# Altium PCB OFP_MCM_v1.6.3.PcbDoc (part 3 of 8)
Units mil, origin at the board's own origin, x right, y up, seen from the top; angles counter-clockwise.
Board outline 4330.71 x 4724.41 mil, 4 copper layers (Top Layer, Layer 1, Layer 2, Bottom Layer), stack 62.047 mil thick; 385 components, 287 nets, 1341 pads, 554 vias.
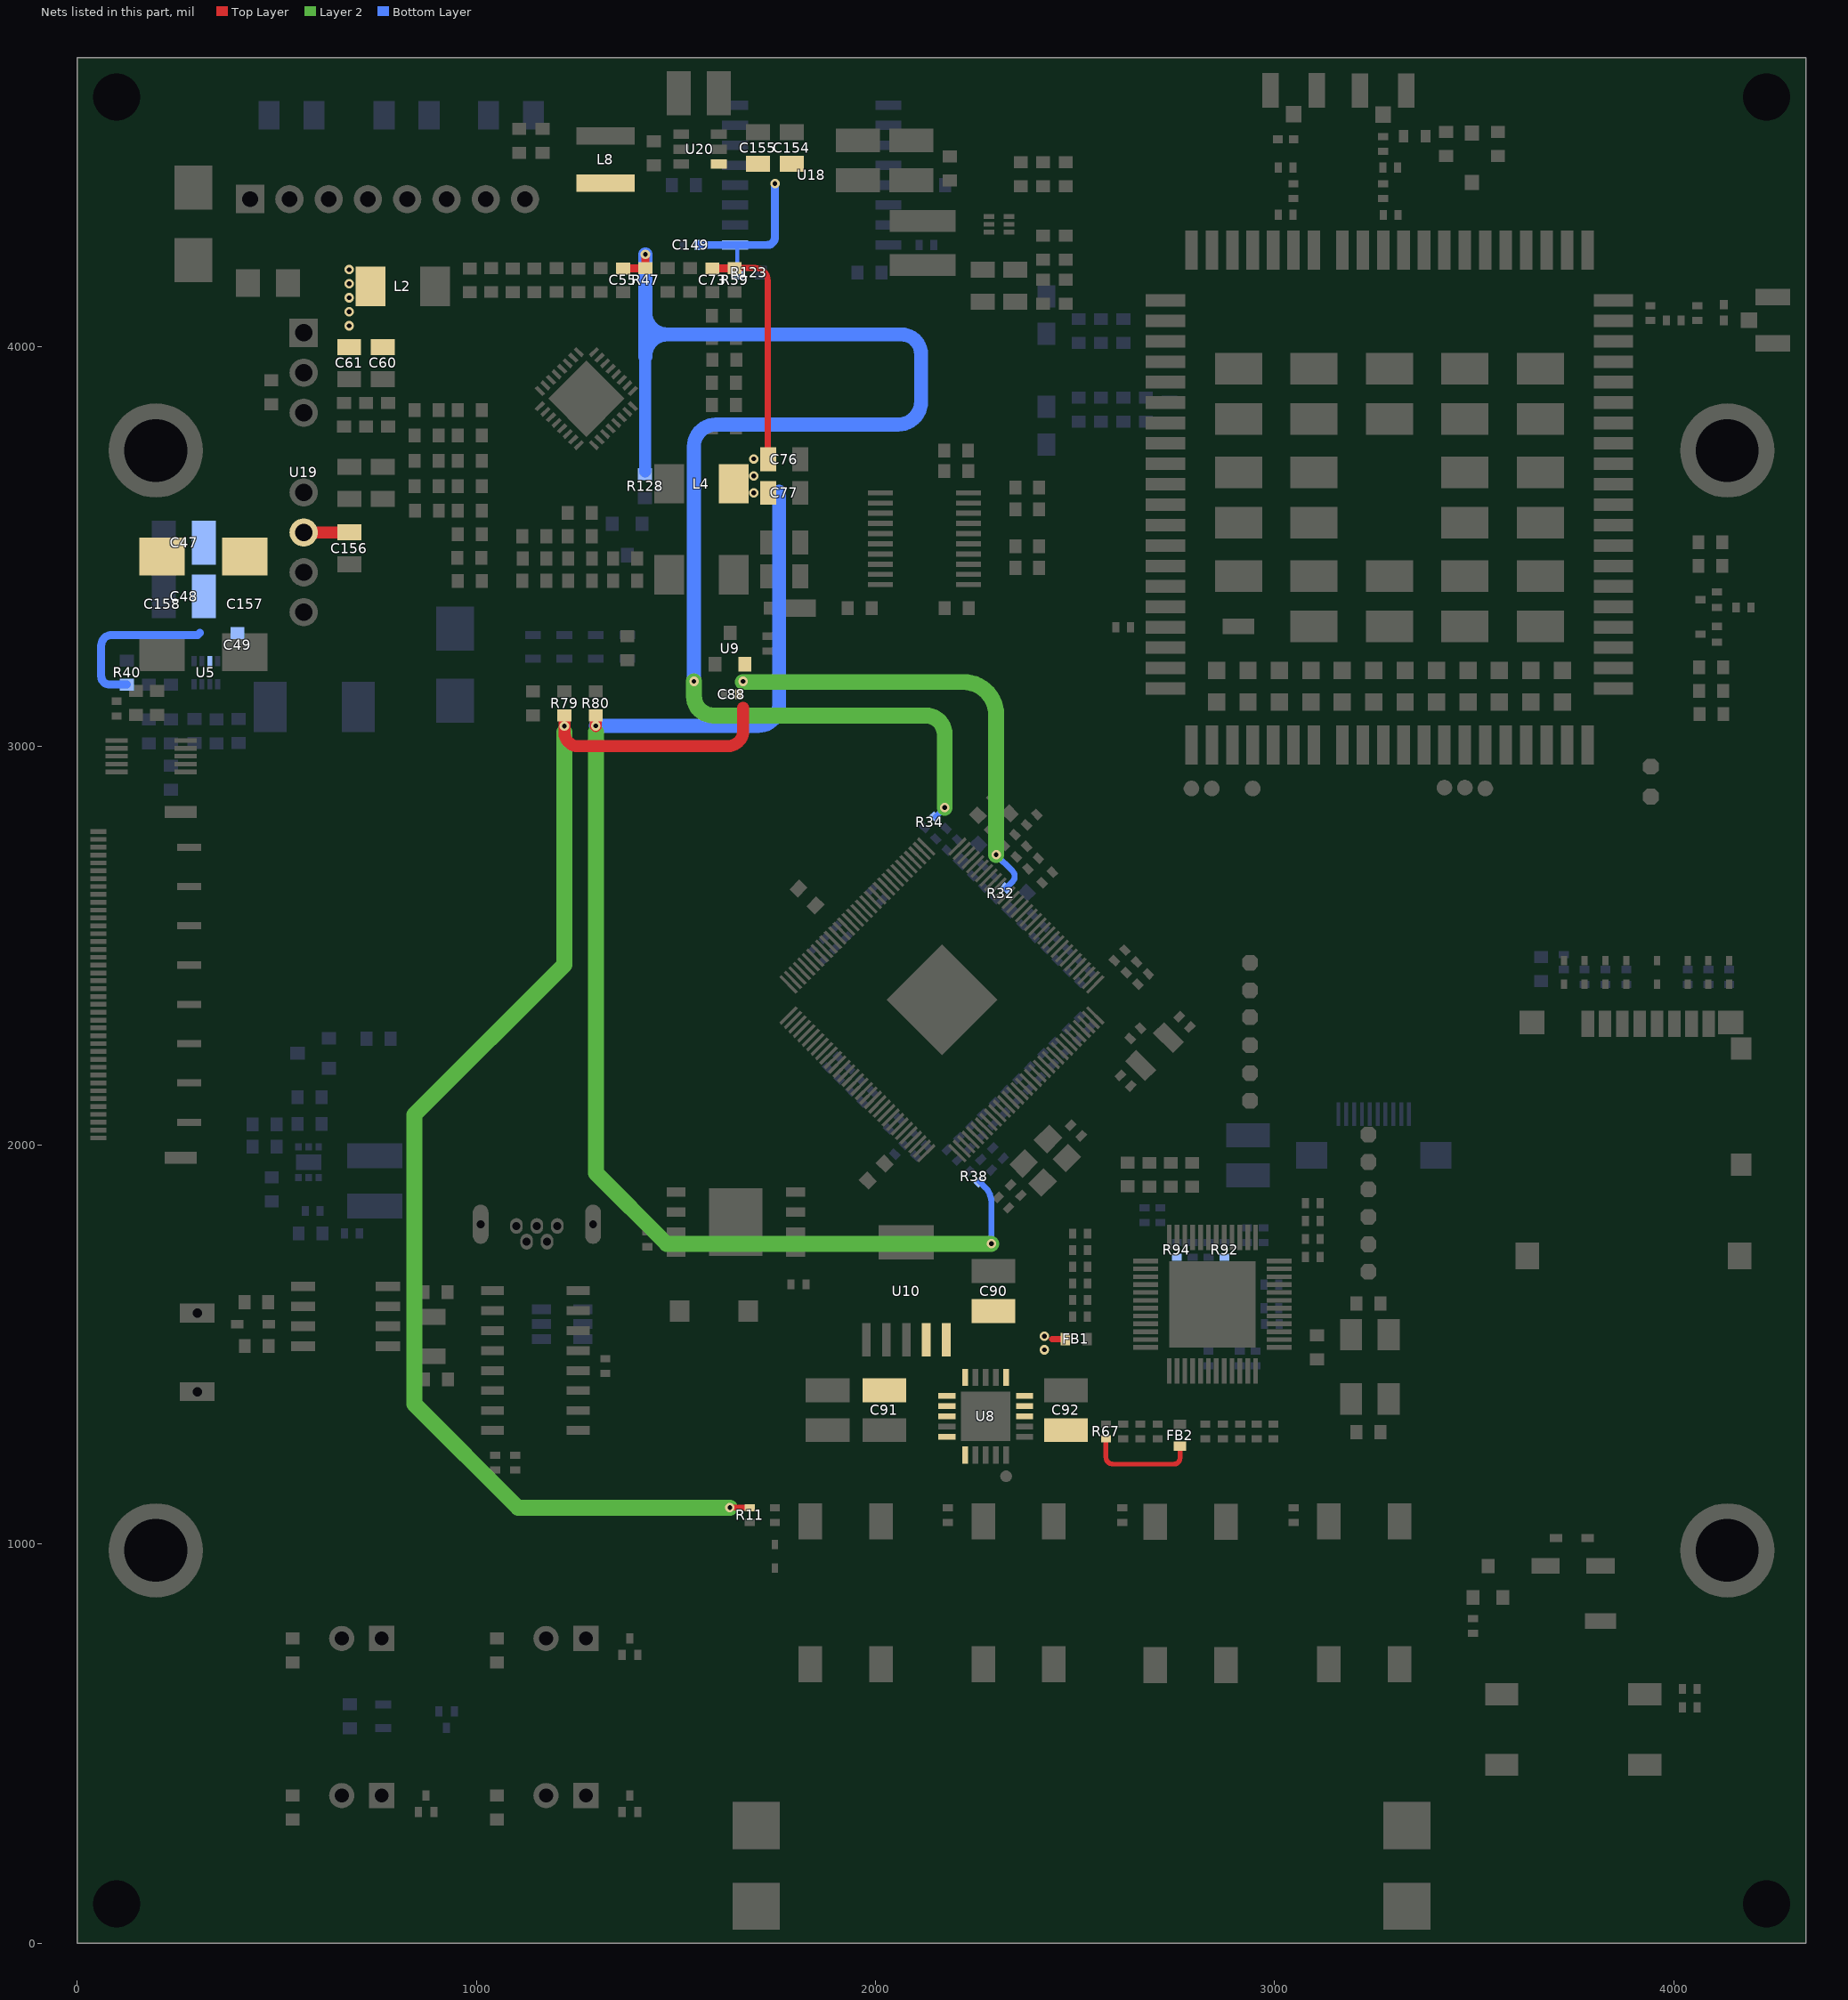
[diagram p4: the nets of this part, all layers, seen from the top]

## Part data (continued)
C152: library part C3216X5R1E476M160AC, "CAP CER 47UF 25V X5R 1206", Case Code (Imperial)=1206, Case Code (Metric)=3216, Dielectric=X5R, Dielectric Material=Ceramic, LCSC Part Number=C2167787, Manufacturer=TDK, Max Operating Temperature=85°C, Min Operating Temperature=-55°C, Package Quantity=1, Supplier Part Number 1=445-8047-1-ND, Tolerance=20%, Voltage=25V, Capacitance=47uF, Case/Package=1206, ComponentLink1Description=https://product.tdk.com/info/en/catalog/datasheets/mlcc_commercial_general_en.pdf?src-supplier=Digi-Key, ComponentLink1URL=https://product.tdk.com/info/en/catalog/datasheets/mlcc_commercial_general_en.pdf?src-supplier=Digi-Key, ComponentLink2Description=https://product.tdk.com/info/en/documents/chara_sheet/C3216X5R1E476M160AC.pdf?src-supplier=Digi-Key, ComponentLink2URL=https://product.tdk.com/info/en/documents/chara_sheet/C3216X5R1E476M160AC.pdf?src-supplier=Digi-Key, ComponentLink3Description=http://www.tdk.com/pdf/general_B11.pdf?src-supplier=Future+Electronics, ComponentLink3URL=http://www.tdk.com/pdf/general_B11.pdf?src-supplier=Future+Electronics, Depth=1.6mm, Height=1.6mm, Lead Free="Lead Free", Length=0.126inch, Manufacturer Part Number=C3216X5R1E476M160AC, Mount="Surface Mount", Packaging="Tape and Reel", Pricing 1="1=1.09, 10=0.862, 50=0.7476, 100=0.6469, 500=0.48876, 1000=0.43125 (USD)", REACH SVHC="No SVHC", Resistor Type=Ceramic, Series=C, Stock 1=886163, Supplier 1=Digi-Key, Termination=SMD/SMT, Thickness=0.071inch, Voltage Rating=25V, Voltage Rating (DC)=25V, Weight=0.000571oz, Width=0.063inch
C156: library part CC0805MKX5R8BB226, "CAP CER 22UF 25V X5R 0805", Case Code (Imperial)=0805, Case Code (Metric)=2012, Dielectric=X5R, LCSC Part Number=C784585, Manufacturer=Yageo, Max Operating Temperature=85°C, Min Operating Temperature=-55°C, Package Quantity=3000, Supplier Part Number 1=311-1903-1-ND, Tolerance=20%, Voltage Rating=25V, Capacitance=22uF, Case/Package=0805, Category="Ceramic Capacitors", ComponentLink1Description=http://www.mouser.com/ds/2/447/Yageo_UPY-GP_NP0_16V-to-50V_9-358835.pdf?src-supplier=Mouser, ComponentLink1URL=http://www.mouser.com/ds/2/447/Yageo_UPY-GP_NP0_16V-to-50V_9-358835.pdf?src-supplier=Mouser, ComponentLink2Description=http://www.yageo.com/documents/recent/UPY-GPHC_X5R_4V-to-50V_25.pdf?src-supplier=Digi-Key, ComponentLink2URL=http://www.yageo.com/documents/recent/UPY-GPHC_X5R_4V-to-50V_25.pdf?src-supplier=Digi-Key, Halogen Free="Halogen Free", Height=1.25mm, Item Type=Capacitor, Lead Free="Lead Free", Length=0.079inch, Manufacturer Part Number=CC0805MKX5R8BB226, Mount="Surface Mount", Packaging="Tape and Reel", Pricing 1="1=0.47000, 10=0.33300, 50=0.25140, 100=0.21900, 500=0.16222, 1000=0.13789 (USD)", RoHS=Yes, RoHS Compliant=Yes, Stock 1=64970, Supplier 1=Digi-Key, Termination=SMD/SMT, Thickness=0.057inch, Voltage Rating (DC)=25V, Weight=0.000194oz, Width=0.049inch
C157 C158: library part TPSD476K025R0150, "47uF 25V 150mΩ@100kHz ±10% CASE-D-7343-31(mm) Tantalum Capacitors ROHS", LCSC Part Number=C284846, Manufacturer="Kyocera AVX", Package=CASE-D-7343-31(mm), Item Type=Capacitor, Manufacturer Part Number=TPSD476K025R0150
D1 D2 D3 D4 D5 D6 D7 D8 D10: "5A 60W 12V 3.6V 3.3V SOD-523 ESD and Surge Protection (TVS/ESD) ROHS", LCSC Part Number=C502551, Manufacturer="MDD(Microdiode Semiconductor)", Package=SOD-523, ComponentLink1Description=LCSC, ComponentLink1URL=https://www.lcsc.com/product-detail/ESD-and-Surge-Protection-TVS-ESD_MDD-Microdiode-Semiconductor-ESD5Z3-3C_C502551.html, Item Type=(TVS/ESD), Manufacturer Part Number=ESD5Z3.3C
D9 D20: "DIODE GEN PURP 75V 200MA SOD523F", Average Rectified Current=200mA, Forward Current=300mA, LCSC Part Number=C232841, Manufacturer="ON Semiconductor / Fairchild", Max Forward Surge Current (Ifsm)=4A, Max Operating Temperature=150°C, Max Repetitive Reverse Voltage (Vrrm)=75V, Max Reverse Current=5uA, Min Operating Temperature=-55°C, Package Quantity=1, Power Dissipation=200mW, Supplier Part Number 1=6145918, Category="Rectifier Diodes", ComponentLink1Description=https://datasheet.ciiva.com/16744/1n4148wt-16744972.pdf?src-supplier=Future+Electronics, ComponentLink1URL=https://datasheet.ciiva.com/16744/1n4148wt-16744972.pdf?src-supplier=Future+Electronics, ComponentLink2Description=https://datasheet.ciiva.com/30479/0900766b810e1cd4-30479226.pdf?src-supplier=Rs, ComponentLink2URL=https://datasheet.ciiva.com/30479/0900766b810e1cd4-30479226.pdf?src-supplier=Rs, ComponentLink3Description=https://datasheet.ciiva.com/15208/getdatasheetpartid-146392-15208359.pdf?src-supplier=Verical, ComponentLink3URL=https://datasheet.ciiva.com/15208/getdatasheetpartid-146392-15208359.pdf?src-supplier=Verical, ComponentLink4Description=https://datasheet.ciiva.com/916/1n914bwt-916865.pdf?src-supplier=Digi-Key, ComponentLink4URL=https://datasheet.ciiva.com/916/1n914bwt-916865.pdf?src-supplier=Digi-Key, ComponentLink5Description=https://datasheet.ciiva.com/916/1n914bwt-916866.pdf?src-supplier=Digi-Key, ComponentLink5URL=https://datasheet.ciiva.com/916/1n914bwt-916866.pdf?src-supplier=Digi-Key, ComponentLink6Description=https://datasheet.ciiva.com/916/1n914bwt-916864.pdf?src-supplier=Digi-Key, ComponentLink6URL=https://datasheet.ciiva.com/916/1n914bwt-916864.pdf?src-supplier=Digi-Key, Contact Plating=Tin,Matte, Element Configuration=Single, Height=0.7mm, Item Type=Diode, Lead Free="Lead Free", Length=1.3mm, Manufacturer Part Number=1N4148WT, Max Reverse Voltage (DC)=75V, Mounting Technology="Surface Mount", Packaging="Tape and Reel", Pins=2, Pricing 1="1=0.0305, 20=0.0267, 125=0.0246, 750=0.0227, 4000=0.0204 (USD)", Radiation Hardening=No, Reach SVHC Compliant=No, Recovery Time=4ns, Reverse Recovery Time=4ns, Reverse Recovery Time-Max=4ns, RoHS=Yes, RoHS Compliant=Yes, Series=-, Stock 1=30, Supplier 1="Future Electronics", Weight=0.01g, Width=0.9mm
D11: library part 1N5819HW-7-F, "DIODE SCHOTTKY 40V 1A SOD123", Average Rectified Current=1A, Capacitance=110pF, Case/Package=SOD-123-2, Forward Voltage=450mV, LCSC Part Number=C82544, Manufacturer=Diodes, Max Forward Surge Current (Ifsm)=25A, Max Operating Temperature=125°C, Max Power Dissipation=450mW, Max Repetitive Reverse Voltage (Vrrm)=40V, Max Reverse Current=50uA, Min Operating Temperature=-65°C, Package Quantity=3000, Supplier Part Number 1=1N5819HW-FDICT-ND, Category="Schottky Diodes", ComponentLink1Description=https://datasheet.ciiva.com/16303/ds30217-16303296.pdf?src-supplier=Future+Electronics, ComponentLink1URL=https://datasheet.ciiva.com/16303/ds30217-16303296.pdf?src-supplier=Future+Electronics, ComponentLink2Description=https://datasheet.ciiva.com/27092/1538419-27092484.pdf?src-supplier=Jameco, ComponentLink2URL=https://datasheet.ciiva.com/27092/1538419-27092484.pdf?src-supplier=Jameco, ComponentLink3Description=https://datasheet.ciiva.com/912/ds30217-912801.pdf?src-supplier=Digi-Key, ComponentLink3URL=https://datasheet.ciiva.com/912/ds30217-912801.pdf?src-supplier=Digi-Key, ComponentLink4Description=https://datasheet.ciiva.com/1177/ds30217-1177089.pdf?src-supplier=Element14, ComponentLink4URL=https://datasheet.ciiva.com/1177/ds30217-1177089.pdf?src-supplier=Element14, ComponentLink5Description=https://datasheet.ciiva.com/912/ds30217-912802.pdf?src-supplier=Digi-Key, ComponentLink5URL=https://datasheet.ciiva.com/912/ds30217-912802.pdf?src-supplier=Digi-Key, ComponentLink6Description=https://datasheet.ciiva.com/912/ds30217-912803.pdf?src-supplier=Digi-Key, ComponentLink6URL=https://datasheet.ciiva.com/912/ds30217-912803.pdf?src-supplier=Digi-Key, ComponentLink7Description=https://datasheet.ciiva.com/8303/ds30217-8303132.pdf?src-supplier=Avnet, ComponentLink7URL=https://datasheet.ciiva.com/8303/ds30217-8303132.pdf?src-supplier=Avnet, ComponentLink8Description=https://datasheet.ciiva.com/25919/ds30217-25919644.pdf?src-supplier=Avnet+Europe, ComponentLink8URL=https://datasheet.ciiva.com/25919/ds30217-25919644.pdf?src-supplier=Avnet+Europe, Contact Plating=Tin,Matte, Current Rating=1A, Element Configuration=Single, Forward Current=1A, Height=1.25mm, Item Type=Diode, Lead Free="Lead Free", Length=2.85mm, Manufacturer Part Number=1N5819HW-7-F, Max Reverse Voltage (DC)=40V, Number of Pins=2, Output Current=1A, Packaging="Tape and Reel", Peak Non-Repetitive Surge Current=25A, Polarity=Standard, Pricing 1="1=0.46000, 10=0.34500, 100=0.19530, 500=0.12936, 1000=0.09918 (USD)", Radiation Hardening=No, REACH SVHC="No SVHC", RoHS=Yes, RoHS Compliant=Yes, Series=-, Supplier 1=Digi-Key, Termination=SMD/SMT, Voltage Rating (DC)=40V, Weight=0.000353oz, Width=1.7mm
D12: "65.2A 9.2V 6.4V 5V Unidirectional SMB TVS ROHS", LCSC Part Number=C440263, Manufacturer=AnBon, Package=SMB, ComponentLink7Description=LCSC, ComponentLink7URL=https://www.lcsc.com/product-detail/TVS_AnBon-SMBJ5-0A_C440263.html, Item Type=Diode, Manufacturer Part Number=SMBJ5.0A
D13: "TVS DIODE 3.3VWM 11.5VC MICROSMP", Breakdown Voltage=4.1V, Clamping Voltage=11V, LCSC Part Number=C241899, Manufacturer="Vishay Semiconductors", Max Operating Temperature=150°C, Max Reverse Leakage Current=200uA, Max Surge Current=75A, Min Operating Temperature=-55°C, Operating Supply Voltage=3.3V, Package Quantity=4500, Peak Pulse Current=87A, Peak Pulse Power=150W, Power Line Protection=No, Supplier Part Number=625-MSP3V3HM3, Test Current=1mA, Category="TVS Diodes", ComponentLink1Description=https://datasheet.ciiva.com/14080/msp3v3-14080471.pdf?src-supplier=Digikey, ComponentLink1URL=https://datasheet.ciiva.com/14080/msp3v3-14080471.pdf?src-supplier=Digikey, ComponentLink2Description=https://datasheet.ciiva.com/14080/msp3v3-14080471.pdf?src-supplier=Digi-Key, ComponentLink2URL=https://datasheet.ciiva.com/14080/msp3v3-14080471.pdf?src-supplier=Digi-Key, Diode Type=ZENER, Direction=Unidirectional, Item Type="TVS Diode", Manufacturer Part Number=MSP3V3HM3/89A, Min Breakdown Voltage=4.1V, Mounting Technology="Surface Mount", Number of Unidirectional Channels=1, Packaging="Tape and Reel", Polarity=Unidirectional, Pricing="1=0.39, 10=0.313, 50=0.313, 100=0.165, 1000=0.068, 10000=0.05 (USD)", Reverse Standoff Voltage=3.3V, RoHS=Yes, RoHS Compliant=Yes, Series="Automotive, AEC-Q101, TransZorb®, eSMP™", Stock=14861, Supplier=Mouser
D14: "TVS DIODE 12VWM 19.9VC DO214AA", LCSC Part Number=C151251, Manufacturer=Littelfuse, ComponentLink1Description=https://datasheet.ciiva.com/15143/getdatasheetpartid-185160-15143884.pdf?src-supplier=Verical, ComponentLink1URL=https://datasheet.ciiva.com/15143/getdatasheetpartid-185160-15143884.pdf?src-supplier=Verical, ComponentLink2Description=https://datasheet.ciiva.com/34302/1546611-34302457.pdf?src-supplier=Jameco, ComponentLink2URL=https://datasheet.ciiva.com/34302/1546611-34302457.pdf?src-supplier=Jameco, ComponentLink3Description=https://datasheet.ciiva.com/25624/0900766b810f4eeb-25624681.pdf?src-supplier=Rs, ComponentLink3URL=https://datasheet.ciiva.com/25624/0900766b810f4eeb-25624681.pdf?src-supplier=Rs, ComponentLink4Description=https://datasheet.ciiva.com/16287/littelfuse-tvs-diode-smbj-16287565.pdf?src-supplier=Future+Electronics, ComponentLink4URL=https://datasheet.ciiva.com/16287/littelfuse-tvs-diode-smbj-16287565.pdf?src-supplier=Future+Electronics, ComponentLink5Description=https://datasheet.ciiva.com/331/littelfuse-tvs-diode-smbj-datasheet-pdf-331137.pdf?src-supplier=Digikey, ComponentLink5URL=https://datasheet.ciiva.com/331/littelfuse-tvs-diode-smbj-datasheet-pdf-331137.pdf?src-supplier=Digikey, ComponentLink6Description=https://datasheet.ciiva.com/331/littelfuse-tvs-diode-smbj-datasheet-pdf-331138.pdf?src-supplier=Digikey, ComponentLink6URL=https://datasheet.ciiva.com/331/littelfuse-tvs-diode-smbj-datasheet-pdf-331138.pdf?src-supplier=Digikey, ComponentLink7Description=https://datasheet.ciiva.com/331/littelfuse-tvs-diode-smbj-datasheet-pdf-331139.pdf?src-supplier=Digikey, ComponentLink7URL=https://datasheet.ciiva.com/331/littelfuse-tvs-diode-smbj-datasheet-pdf-331139.pdf?src-supplier=Digikey, ComponentLink8Description=https://datasheet.ciiva.com/8062/littelfuse-tvs-diode-smbj-8062301.pdf?src-supplier=Element14, ComponentLink8URL=https://datasheet.ciiva.com/8062/littelfuse-tvs-diode-smbj-8062301.pdf?src-supplier=Element14, Item Type="TVS Diodes", Manufacturer Part Number=SMBJ12A, Pricing="1=0.32, 10=0.215, 100=0.104 (USD)", RoHS=Yes, Stock=39718, Supplier=Digikey
D15 D16: "TVS DIODE 3.6VWM 19VC 2X1SON", Breakdown Voltage=6.7V, Case Code (Imperial)=0402, Case Code (Metric)=1006, Manufacturer="Texas Instruments", Max Operating Temperature=125°C, Min Operating Temperature=-40°C, Peak Pulse Current=1.7A, Peak Pulse Power=15W, Power Line Protection=No, Reverse Standoff Voltage=3.6V, Supplier Part Number=296-47864-1-ND, Case/Package=0402, Category="Integrated Circuits (ICs)", ComponentLink1Description=http://www.ti.com/lit/ds/symlink/tpd1e0b04.pdf?src-supplier=Digikey, ComponentLink1URL=http://www.ti.com/lit/ds/symlink/tpd1e0b04.pdf?src-supplier=Digikey, ComponentLink2Description=http://www.ti.com/general/docs/suppproductinfo.tsp?distId=10&amp;gotoUrl=http%3A%2F%2Fwww.ti.com%2Flit%2Fgpn%2Ftpd1e0b04&src-supplier=Digikey, ComponentLink2URL=http://www.ti.com/general/docs/suppproductinfo.tsp?distId=10&amp;gotoUrl=http%3A%2F%2Fwww.ti.com%2Flit%2Fgpn%2Ftpd1e0b04&src-supplier=Digikey, Diode Type=ZENER, Direction=211Direction, Height=450um, Interface=USB, Length=600um, Manufacturer Part Number=TPD1E0B04DPYR, Min Breakdown Voltage=6.7V, Mounting Technology="Surface Mount", Number of Bidirectional Channels=1, Number of Channels=1, Packaging="Cut Tape", Pins=2NUMBER, Pricing="1=0.32, 10=0.216, 100=0.095, 500=0.09, 1000=0.08874 (USD)", RoHS=Yes, RoHS Compliant=Yes, Series=-, Stock=16132, Supplier=Digikey, Thickness=370um, Width=1mm
D17 D18 D19: "TVS DIODE 3.3VWM 6.8VC SOD123F", Breakdown Voltage=3.4V, LCSC Part Number=C2649858, Manufacturer=Littelfuse, Max Breakdown Voltage=4.3V, Max Operating Temperature=150°C, Max Reverse Leakage Current=500nA, Min Operating Temperature=-55°C, Peak Pulse Current=30A, Peak Pulse Power=200W, Power Line Protection=No, Reverse Standoff Voltage=3.3V, Test Current=10mA, Diode Type=ZENER, Direction=210Direction, Height=1.08mm, Item Type="TVS Diodes", Manufacturer Part Number=SMF3.3, Min Breakdown Voltage=3.4V, Mounting Technology="Surface Mount", Number of Channels=1NUMBER, Number of Unidirectional Channels=1, Packaging="Cut Tape", Pricing="1=0.49, 10=0.313, 100=0.171, 500=0.153, 1000=0.151 (USD)", Reverse Voltage=3.3V, RoHS=Yes, RoHS Compliant=Yes, Series=SMF, Stock=66904, Supplier=Digikey
FB1 FB2: "FERRITE BEAD 220 OHM 0603 1LN", Case Code (Imperial)=0603, Case Code (Metric)=1608, Current Rating=1.4A, DC Resistance (DCR)=100mR, ESR (Equivalent Series Resistance)=220R, LCSC Part Number=C80165, Manufacturer=Murata, Manufacturer Series=BLM18P, Max Operating Temperature=125°C, Min Operating Temperature=-55°C, Package Quantity=1, Test Frequency=100MHz, Tolerance=25%, Case/Package=0603, Channels=1, ComponentLink1Description=https://datasheet.ciiva.com/19458/1845030-19458417.pdf?src-supplier=Jameco, ComponentLink1URL=https://datasheet.ciiva.com/19458/1845030-19458417.pdf?src-supplier=Jameco, ComponentLink2Description=https://datasheet.ciiva.com/11800/0900766b81275ca5-11800851.pdf?src-supplier=Rs, ComponentLink2URL=https://datasheet.ciiva.com/11800/0900766b81275ca5-11800851.pdf?src-supplier=Rs, ComponentLink3Description=https://datasheet.ciiva.com/29347/442391-da-01-en-chip-drossel-0603-220r-1400ma-1-6x0-8mm-29347986.pdf?src-supplier=Conrad, ComponentLink3URL=https://datasheet.ciiva.com/29347/442391-da-01-en-chip-drossel-0603-220r-1400ma-1-6x0-8mm-29347986.pdf?src-supplier=Conrad, ComponentLink4Description=https://datasheet.ciiva.com/8021/5148-8021482.pdf?src-supplier=Element14, ComponentLink4URL=https://datasheet.ciiva.com/8021/5148-8021482.pdf?src-supplier=Element14, ComponentLink5Description=https://datasheet.ciiva.com/8021/5148-8021479.pdf?src-supplier=Element14, ComponentLink5URL=https://datasheet.ciiva.com/8021/5148-8021479.pdf?src-supplier=Element14, ComponentLink6Description=https://datasheet.ciiva.com/14122/blm-series-eng-tds-14122909.pdf?src-supplier=Distrelec, ComponentLink6URL=https://datasheet.ciiva.com/14122/blm-series-eng-tds-14122909.pdf?src-supplier=Distrelec, ComponentLink7Description=https://datasheet.ciiva.com/1012/l0110s0100blm18p-1012162.pdf?src-supplier=Digikey, ComponentLink7URL=https://datasheet.ciiva.com/1012/l0110s0100blm18p-1012162.pdf?src-supplier=Digikey, ComponentLink8Description=https://datasheet.ciiva.com/1012/l0110s0100blm18p-1012161.pdf?src-supplier=Digikey, ComponentLink8URL=https://datasheet.ciiva.com/1012/l0110s0100blm18p-1012161.pdf?src-supplier=Digikey, ComponentLink9Description=https://datasheet.ciiva.com/1012/l0110s0100blm18p-1012163.pdf?src-supplier=Digikey, ComponentLink9URL=https://datasheet.ciiva.com/1012/l0110s0100blm18p-1012163.pdf?src-supplier=Digikey, ComponentLink10Description=https://datasheet.ciiva.com/3081/l0110s0100blm18p-3081633.pdf?src-supplier=Avnet, ComponentLink10URL=https://datasheet.ciiva.com/3081/l0110s0100blm18p-3081633.pdf?src-supplier=Avnet, ComponentLink11Description=https://datasheet.ciiva.com/16205/l0110s0100blm18p-16205422.pdf?src-supplier=Future+Electronics, ComponentLink11URL=https://datasheet.ciiva.com/16205/l0110s0100blm18p-16205422.pdf?src-supplier=Future+Electronics, Core Material=Ferrite, DC Current=1.4A, DC Resistance-Max=100mR, Depth=0.8mm, ESR=100mR, Height=0.8mm, Impedance=220R, Item Type="Ferrite Bead", Lead Free="Lead Free", Length=1.6mm, Manufacturer Part Number=BLM18PG221SN1D, Material=Steel,Ferrite, Max Current Rating=1.4A, Max DC Current=1.4A, Number of Circuits=1, Number of Lines=1, Packaging="Tape and Reel", Pins=2, Pricing="1=0.1, 10=0.078, 25=0.0712, 50=0.064, 100=0.0469, 250=0.03412, 500=0.03128, 1000=0.02701 (USD)", Radiation Hardening=No, Reach SVHC Compliant=No, RMS Current (Irms)=1.4A, RoHS=Yes, RoHS Compliant=Yes, Series=BLM18P, Shielding=Unshielded, Stock=134052, Supplier=Digikey, Termination=SMD/SMT, Weight=7.1E-05oz, Width=0.8mm
J1: "1.10mm Pitch microSD Memory Card Connector, Reverse Mount SMT, Push-Push Type", Manufacturer=Molex, Max Operating Temperature=85°C, Min Operating Temperature=-25°C, Supplier Part Number=502774-0891, Voltage Rating=10V, Category="Memory Connectors", ComponentLink1Description=https://datasheet.ciiva.com/4581/5027740891-memory-card-socket-179575-4581102.pdf?src-supplier=Mouser, ComponentLink1URL=https://datasheet.ciiva.com/4581/5027740891-memory-card-socket-179575-4581102.pdf?src-supplier=Mouser, ComponentLink2Description=https://datasheet.ciiva.com/683/5027740891-sd-683628.pdf?src-supplier=Digikey, ComponentLink2URL=https://datasheet.ciiva.com/683/5027740891-sd-683628.pdf?src-supplier=Digikey, ComponentLink3Description=https://datasheet.ciiva.com/15226/getdatasheetpartid-119109-15226226.pdf?src-supplier=Verical, ComponentLink3URL=https://datasheet.ciiva.com/15226/getdatasheetpartid-119109-15226226.pdf?src-supplier=Verical, ComponentLink4Description=https://datasheet.ciiva.com/11755/0900766b80f752a0-11755064.pdf?src-supplier=Rs, ComponentLink4URL=https://datasheet.ciiva.com/11755/0900766b80f752a0-11755064.pdf?src-supplier=Rs, ComponentLink5Description=https://datasheet.ciiva.com/1104/1499551-1104671.pdf?src-supplier=Element14, ComponentLink5URL=https://datasheet.ciiva.com/1104/1499551-1104671.pdf?src-supplier=Element14, ComponentLink6Description=https://datasheet.ciiva.com/1104/ps-502774-001-1104670.pdf?src-supplier=Element14, ComponentLink6URL=https://datasheet.ciiva.com/1104/ps-502774-001-1104670.pdf?src-supplier=Element14, ComponentLink7Description=https://datasheet.ciiva.com/16655/5027740891-memory-card-socket-16655603.pdf?, ComponentLink7URL=https://datasheet.ciiva.com/16655/5027740891-memory-card-socket-16655603.pdf?, ComponentLink8Description=https://datasheet.ciiva.com/683/5027740891-sd-683629.pdf?src-supplier=Digikey, ComponentLink8URL=https://datasheet.ciiva.com/683/5027740891-sd-683629.pdf?src-supplier=Digikey, ComponentLink9Description=https://datasheet.ciiva.com/683/5027740891-sd-683630.pdf?src-supplier=Digikey, ComponentLink9URL=https://datasheet.ciiva.com/683/5027740891-sd-683630.pdf?src-supplier=Digikey, Contact Material="Copper Alloy,Copper", Contact Plating=Gold, Depth=16mm, Gender=Male, Halogen Free="Low Halogen", Housing Material=Polymer, Length=14.6mm, Manufacturer Part Number=5027740891, Mounting Technology="Surface Mount", Number of Circuits=8, Number of Contacts=8, Number of Rows=1, Orientation="Right Angle", Packaging="Tape and Reel", Pitch=1.1mm, Pricing="6000=1.765 (USD)", Radiation Hardening=No, Reach SVHC Compliant=Unknown, RoHS=Yes, Series="microSD Card", Stock=11000, Supplier="Arrow Electronics", Termination=Solder, Width=1.8mm
J2: "Flip type 10P Bottom Contact Horizontal attachment 0.5mm SMD,P=0.5mm FFC, FPC (Flat Flexible) Connector Assemblies ROHS", LCSC Part Number=C5691101, Manufacturer=hanxia, Package=SMD,P=0.5mm, ComponentLink1Description=LCSC, ComponentLink1URL=https://www.lcsc.com/product-detail/FFC-FPC-Flat-Flexible-Connector-Assemblies_hanxia-HX0-5-10P-XJH2-0-043_C5691101.html?s_z=n_HX0.5-10P%20XJH2.0%20043, Item Type="FFC/FPC Cable", Manufacturer Part Number="HX0.5-10P XJH2.0 043"
J3: "1A USB 2.0 1 Direct Insert 5P Female Micro-B Plugin USB Connectors ROHS", LCSC Part Number=C707313, Manufacturer="HRO Electronics", Item Type="USB Micro B", Manufacturer Part Number=U-D-M5DD-Y-3, Pricing="5=0.2652, 50=0.2088, 150=0.1847, 500=0.1519, 2500=0.1385, 5000=0.1304 (USD)", RoHS=No, Stock=110, Supplier=LCSC
J4: "CONN FFC BOTTOM 40POS 0.5MM R/A", LCSC Part Number=C596805, Manufacturer=Hirose, ComponentLink1Description=https://datasheet.ciiva.com/11745/0900766b80fce72e-11745604.pdf?src-supplier=Rs, ComponentLink1URL=https://datasheet.ciiva.com/11745/0900766b80fce72e-11745604.pdf?src-supplier=Rs, ComponentLink2Description=https://datasheet.ciiva.com/7989/1512288-7989402.pdf?src-supplier=Element14, ComponentLink2URL=https://datasheet.ciiva.com/7989/1512288-7989402.pdf?src-supplier=Element14, ComponentLink3Description=https://datasheet.ciiva.com/5772/1512288-5772907.pdf?src-supplier=Farnell, ComponentLink3URL=https://datasheet.ciiva.com/5772/1512288-5772907.pdf?src-supplier=Farnell, Connector Type=4640ConnectorType, Height=2.5mm, Item Type="Card Edge Connectors", Length=24mm, Manufacturer Part Number=FH41-40S-0.5SH(05), Pricing="1=2.72, 10=2.313, 25=2.1676, 50=2.064, 100=1.9654, 250=1.84232, 500=1.75438, 1000=1.7289 (USD)", RoHS=Yes, RoHS Compliant=5897YesNo, Stock=4133, Supplier=Digikey, Width=6.2mm
J5 J6: "CONN U.FL RCPT STR 50 OHM SMD", Case/Package=SMD/SMT, Clock Frequency=6GHz, Color=46Colour, Current Rating=3A, Dielectric Material=Polymer, Housing Color=Beige, LCSC Part Number=C434808, Manufacturer=Hirose, Max Operating Temperature=90°C, Min Operating Temperature=-40°C, Operating Frequency="0 to 6 GHz", Package Quantity=1, Body Material=Bronze, Body Plating=Silver, Center Contact Plating=Gold, ComponentLink1Description=https://datasheet.ciiva.com/15173/getdatasheetpartid-449682-15173227.pdf?src-supplier=Verical, ComponentLink1URL=https://datasheet.ciiva.com/15173/getdatasheetpartid-449682-15173227.pdf?src-supplier=Verical, Connector Type="Receptacle,Coaxial,Male Pin", Contact Material=Brass, Contact Plating=Gold, Depth=3.1mm, Fastening Type=SNAP-ON, Impedance=50R, Item Type="RF / Coaxial Connectors", Lead Free="Lead Free", Lead Pitch=2.54mm, Length=3mm, Manufacturer Part Number=U.FL-R-SMT(10), Mating Cycles=30, Mounting Technology="Surface Mount", Number of Contacts=3NUMBER, Number of Ports=1, Orientation=Vertical, Packaging="Tape and Reel", Plating=Silver, Pricing="1=1.2, 10=0.975, 25=0.8992, 50=0.8454, 100=0.7949, 250=0.7328, 500=0.6891, 1000=0.64802 (USD)", Radiation Hardening=No, RoHS=Yes, RoHS Compliant=Yes, Series=U.FL, Stock=20830, Supplier=Digikey, Termination=Solder
J8: library part U.FL-R-SMT(10), "CONN U.FL RCPT STR 50 OHM SMD", Case/Package=SMD/SMT, Clock Frequency=6GHz, Color=46Colour, Current Rating=3A, Dielectric Material=Polymer, Housing Color=Beige, LCSC Part Number=C434808, Manufacturer=Hirose, Max Operating Temperature=90°C, Min Operating Temperature=-40°C, Operating Frequency="0 to 6 GHz", Package Quantity=1, Body Material=Bronze, Body Plating=Silver, Center Contact Plating=Gold, ComponentLink1Description=https://datasheet.ciiva.com/15173/getdatasheetpartid-449682-15173227.pdf?src-supplier=Verical, ComponentLink1URL=https://datasheet.ciiva.com/15173/getdatasheetpartid-449682-15173227.pdf?src-supplier=Verical, Connector Type="Receptacle,Coaxial,Male Pin", Contact Material=Brass, Contact Plating=Gold, Depth=3.1mm, Fastening Type=SNAP-ON, Impedance=50R, Item Type="RF / Coaxial Connectors", Lead Free="Lead Free", Lead Pitch=2.54mm, Length=3mm, Manufacturer Part Number=U.FL-R-SMT(10), Mating Cycles=30, Mounting Technology="Surface Mount", Number of Contacts=3NUMBER, Number of Ports=1, Orientation=Vertical, Packaging="Tape and Reel", Plating=Silver, Pricing="1=1.2, 10=0.975, 25=0.8992, 50=0.8454, 100=0.7949, 250=0.7328, 500=0.6891, 1000=0.64802 (USD)", Radiation Hardening=No, RoHS=Yes, RoHS Compliant=Yes, Series=U.FL, Stock=20830, Supplier=Digikey, Termination=Solder
J10: "CONN HEADER VERT 8POS 2.5MM", Color=Natural, Contact Resistance=20mR, Current Rating=3A, Housing Color=White, Insulation Resistance=1GR, LCSC Part Number=C157972, Manufacturer=JST, Max Operating Temperature=85°C, Max Voltage Rating (AC)=250V, Min Operating Temperature=-25°C, ComponentLink1Description=https://datasheet.ciiva.com/11747/0900766b80826540-11747580.pdf?src-supplier=Rs, ComponentLink1URL=https://datasheet.ciiva.com/11747/0900766b80826540-11747580.pdf?src-supplier=Rs, ComponentLink2Description=https://datasheet.ciiva.com/26894/getdatasheetpartid-440408-26894817.pdf?src-supplier=Verical, ComponentLink2URL=https://datasheet.ciiva.com/26894/getdatasheetpartid-440408-26894817.pdf?src-supplier=Verical, Contact Material=Brass, Contact Plating=Tin,Lead,Copper, Contact Type="Male Pin", Depth=5.75mm, Fastening Type=Detent, Housing Material=Polyamide, Item Type="Wire to Board Connector", Lead Free=5697LeadFree, Lead Pitch=2.5mm, Length=22.4mm, Manufacturer Part Number=B8B-XH-A(LF)(SN), Max Current Rating=3A, Mounting Technology="Through Hole", Number of Contacts=8, Number of Positions=8, Number of Rows=1, Orientation=Straight, Packaging=Bulk, Pitch=2.5mm, Reach SVHC Compliant=No, RoHS=Yes, Series=XH, Stock=14940, Supplier=Rs, Termination=Press-Fit, Voltage Rating=250V, Voltage Rating (AC)=250V, Weight=28.349523g, Wire/Cable Gauge=22AWG
L1: library part ETQ-P3M6R8KVN, "FIXED IND 6.8UH 4.5A 50.16 MOHM", LCSC Part Number=C412310, Manufacturer=Panasonic, ComponentLink1Description=http://www.farnell.com/datasheets/2820815.pdf?src-supplier=Farnell, ComponentLink1URL=http://www.farnell.com/datasheets/2820815.pdf?src-supplier=Farnell, ComponentLink2Description=https://industrial.panasonic.com/cdbs/www-data/pdf/AGL0000/AGL0000C63.pdf?src-supplier=Digikey, ComponentLink2URL=https://industrial.panasonic.com/cdbs/www-data/pdf/AGL0000/AGL0000C63.pdf?src-supplier=Digikey, ComponentLink3Description=https://datasheet.octopart.com/ETQ-P3M6R8KVN-Panasonic-datasheet-136412728.pdf?src-supplier=Element14, ComponentLink3URL=https://datasheet.octopart.com/ETQ-P3M6R8KVN-Panasonic-datasheet-136412728.pdf?src-supplier=Element14, Item Type=Inductors, Manufacturer Part Number=ETQ-P3M6R8KVN, Pricing="1=0.84, 10=0.609, 50=0.609, 100=0.502, 1000=0.405, 10000=0.344 (USD)", RoHS=Yes, Stock=4626, Supplier=Mouser
L2 L3 L4: library part YSPI0518S-4R7M, "4.7uH Molded Inductor ±20% SMD,5.4x5.2mm Fixed Inductors ROHS", LCSC Part Number=C46595826, Manufacturer=YJYCOIN, Package=SMD,5.4x5.2mm, Item Type=Inductor, Manufacturer Part Number=YSPI0518S-4R7M
L5: library part SRN4018-4R7M, "FIXED IND 4.7UH 1.9A 84 MOHM SMD", Case/Package=Nonstandard, Current Rating=1.9A, DC Resistance (DCR)=84mR, Inductance Tolerance=20%, LCSC Part Number=C780206, Manufacturer=Bourns, Max Operating Temperature=120°C, Min Operating Temperature=-25°C, Package Quantity=3000, Saturation Current=2A, Self Resonant Frequency=35MHz, Supplier Part Number=C135270, Test Frequency=100kHz, Category="Fixed Inductors", ComponentLink1Description=https://datasheet.ciiva.com/6700/srn4018-6700960.pdf?src-supplier=Digikey, ComponentLink1URL=https://datasheet.ciiva.com/6700/srn4018-6700960.pdf?src-supplier=Digikey, Core Material=Ferrite, Depth=4.2mm, ESR=84mR, Height=1.8mm, Height - Seated (Max)=0.071inch, Length=4mm, Manufacturer Part Number=SRN4018-4R7M, Material=Steel, Max DC Current=1.9A, Mounting Technology="Surface Mount", Packaging="Cut Tape", Pins=2, Pricing="10=0.0497, 100=0.0399, 300=0.035, 2000=0.0313, 4000=0.0283, 10000=0.0269 (USD)", Q Factor=9NUMBER, Radiation Hardening=No, Reach SVHC Compliant=No, RMS Current (Irms)=1.9A, RoHS=Yes, RoHS Compliant=Yes, Sample Rate (Hz)=100kHz, Series=SRN4018, Shielding=Shielded, Stock=13110, Supplier=Rs, Termination=SMD/SMT, Tolerance=20%, Width=4mm
L6: library part YNR4018-220M, "590mA 22uH ±20% SMD,4x4x1.8mm Power Inductors ROHS", LCSC Part Number=C340373, Manufacturer=YJYCOIN, Package=SMD,4x4x1.8mm, ComponentLink1Description=LCSC, ComponentLink1URL=https://www.lcsc.com/product-detail/Power-Inductors_YJYCOIN-YNR4018-220M_C340373.html, Item Type=Inductor, Manufacturer Part Number=YNR4018-220M
L7: library part LQG18HH47NJ00D, "FIXED IND 47NH 400MA 0.7OHM SMD", Case Code (Imperial)=0603, DC Resistance (DCR)=700mR, LCSC Part Number=C524629, Manufacturer=Murata, Max Operating Temperature=125°C, Min Operating Temperature=-55°C, Package Quantity=4000, Self Resonant Frequency=900MHz, Test Frequency=100MHz, Tolerance=5%, Case/Package=0603, ComponentLink1Description=https://datasheet.ciiva.com/4981/o05e-4981638.pdf?src-supplier=Mouser, ComponentLink1URL=https://datasheet.ciiva.com/4981/o05e-4981638.pdf?src-supplier=Mouser, Core Material=Air, Item Type=Inductors, Manufacturer Part Number=LQG18HH47NJ00D, Mounting Technology="Surface Mount", Packaging="Tape and Reel", Pricing="1=0.23, 10=0.15, 50=0.15, 100=0.116, 1000=0.097, 10000=0.077 (USD)", RoHS=Yes, RoHS Compliant=Yes, Series=LQG18, Stock=2276, Supplier=Mouser, Termination=SMD/SMT
L8: library part FNR4030S3R9MT, "2.3A 3.9uH ±20% 3.3A SMD,4x4mm Power Inductors ROHS", LCSC Part Number=C167872, Manufacturer=cjiang, ComponentLink1Description=LCSC, ComponentLink1URL=https://www.lcsc.com/product-detail/Power-Inductors_cjiang-Changjiang-Microelectronics-Tech-FNR4030S3R9MT_C167872.html, Item Type=Inductor, Manufacturer Part Number=FNR4030S3R9MT
LED1: library part DY-333SDRD-SN-A3(EL)(HF), "D=5mm LED Indication - Discrete ROHS", LCSC Part Number=C7470717, Manufacturer=TONYU, Item Type=LED, Manufacturer Part Number=DY-333SDRD-SN-A3(EL)(HF), Pricing="10=0.0326, 100=0.0264, 500=0.0221, 1000=0.0197, 5000=0.0178, 10000=0.0169 (USD)", RoHS=No, Supplier=LCSC
LED2 LED3 LED4 LED5 LED8: library part NCD0603R3, "RED LED 0603 Light Emitting Diodes", LCSC Part Number=C3151730, Manufacturer="Foshan NationStar Optoelectronics", Package=0603, ComponentLink1Description=LCSC, ComponentLink1URL=https://www.lcsc.com/product-detail/Light-Emitting-Diodes-LED_Foshan-NationStar-Optoelectronics-NCD0603R3_C3151730.html, Item Type=LED, Manufacturer Part Number=NCD0603R3
LED6 LED11: library part 333-2SYGD/S530-E2-L, "333-2 Series Yellow Green 5 x 5.9 x 8.6 mm 30° 80 mcd Diffused 2.4 V LED", LCSC Part Number=C99697, Manufacturer=Everlight, ComponentLink1Description=https://datasheet.octopart.com/333-2SYGD-S530-E2-L-Everlight-datasheet-27835065.pdf?src-supplier=Future+Electronics, ComponentLink1URL=https://datasheet.octopart.com/333-2SYGD-S530-E2-L-Everlight-datasheet-27835065.pdf?src-supplier=Future+Electronics, Item Type=LED, Manufacturer Part Number=333-2SYGD/S530-E2-L, Pricing="500=0.0295, 2000=0.0286, 7500=0.0277, 20000=0.0271, 50000=0.0261 (USD)", Supplier="Future Electronics"
LED7: library part 333-2UYD/S530-A3-L, "LED YELLOW DIFFUSED 5MM T/H", LCSC Part Number=C88602, Manufacturer=Everlight, Item Type=LED, Manufacturer Part Number=333-2UYD/S530-A3-L, RoHS=No, Supplier=Digikey
LED10: library part NCD0603Y2, "yellow 0603 Light Emitting Diodes (LED) ROHS", LCSC Part Number=C89811, Manufacturer="Foshan NationStar Optoelectronics", Package=0603, ComponentLink1Description=LCSC, ComponentLink1URL=https://www.lcsc.com/product-detail/Light-Emitting-Diodes-LED_Foshan-NationStar-Optoelectronics-NCD0603Y2_C89811.html, Item Type=LED, Manufacturer Part Number=NCD0603Y2
LS1: "80dB Passive (external drive) Electromagnetic Type 4kHz SMD,5x5mm Buzzers ROHS", LCSC Part Number=C391030, Manufacturer=FUET, Package=SMD,5x5mm, ComponentLink1Description=LCSC, ComponentLink1URL=https://www.lcsc.com/product-detail/Buzzers_FUET-FUET-5025_C391030.html, Item Type=Buzzers, Manufacturer Part Number=FUET-5025
Q1: "TRANS NPN 40V 0.6A SMD SOT23-3", Case/Package=SOT-23, Collector Base Voltage (VCBO)=75V, Collector Emitter Breakdown Voltage=40V, Collector Emitter Saturation Voltage=1V, Continuous Collector Current=600mA, Current=1A, Emitter Base Voltage (VEBO)=6V, Frequency=300MHz, LCSC Part Number=C94515, Manufacturer=Diodes, Max Operating Temperature=150°C, Max Power Dissipation=300mW, Min Operating Temperature=-55°C, Package Quantity=3000, Power Dissipation=350mW, Supplier Part Number 1=MMBT2222A-FDIDKR-ND, Collector Emitter Voltage (VCEO)=40V, ComponentLink1Description=http://www.diodes.com/datasheets/ds30041.pdf?src-supplier=Future+Electronics, ComponentLink1URL=http://www.diodes.com/datasheets/ds30041.pdf?src-supplier=Future+Electronics, ComponentLink2Description=http://www.diodes.com/datasheets/ds30041.pdf?src-supplier=Avnet, ComponentLink2URL=http://www.diodes.com/datasheets/ds30041.pdf?src-supplier=Avnet, ComponentLink3Description=https://www.verical.com/server-webapp/html/getDatasheet?partID=82692&src-supplier=Verical, ComponentLink3URL=https://www.verical.com/server-webapp/html/getDatasheet?partID=82692&src-supplier=Verical, ComponentLink4Description=https://www.diodes.com/assets/Datasheets/ds30041.pdf?src-supplier=Digi-Key, ComponentLink4URL=https://www.diodes.com/assets/Datasheets/ds30041.pdf?src-supplier=Digi-Key, ComponentLink5Description=http://www.diodes.com/datasheets/ds30041.pdf?src-supplier=Avnet+Europe, ComponentLink5URL=http://www.diodes.com/datasheets/ds30041.pdf?src-supplier=Avnet+Europe, ComponentLink6Description=http://www.diodes.com/datasheets/ds30041.pdf?src-supplier=Element14, ComponentLink6URL=http://www.diodes.com/datasheets/ds30041.pdf?src-supplier=Element14, Contact Plating=Matte,Tin, Current Rating=600mA, Element Configuration=Single, Gain Bandwidth Product=300MHz, Height=1mm, hFE Min=100, Item Type=Mosfet, Lead Free="Lead Free", Length=3.05mm, Manufacturer Part Number=MMBT2222A-7-F, Max Breakdown Voltage=40V, Max Collector Current=600mA, Max Frequency=300MHz, Mount="Surface Mount", Number of Elements=1, Number of Pins=3, Packaging="Tape and Reel", Polarity=NPN, Pricing 1="1=0.15, 10=0.134, 100=0.0729, 500=0.04486, 1000=0.03059 (USD)", Radiation Hardening=No, REACH SVHC="No SVHC", Stock 1=2471182, Supplier 1=Digi-Key, Termination=SMD/SMT, Transition Frequency=300MHz, Voltage=40V, Voltage Rating (DC)=40V, Weight=0.000282oz, Width=1.4mm
Q2 Q3 Q4 Q5 Q6 Q7: "TRANS PREBIAS NPN 50V 0.1A EMT3", LCSC Part Number=C111728, Manufacturer=Rohm, ComponentLink1Description=https://datasheet.ciiva.com/988/dtc143z-988064.pdf?src-supplier=Digikey, ComponentLink1URL=https://datasheet.ciiva.com/988/dtc143z-988064.pdf?src-supplier=Digikey, ComponentLink2Description=https://datasheet.ciiva.com/5781/dtc143ze-5781998.pdf?src-supplier=Farnell, ComponentLink2URL=https://datasheet.ciiva.com/5781/dtc143ze-5781998.pdf?src-supplier=Farnell, ComponentLink3Description=https://datasheet.ciiva.com/988/dtc143z-988062.pdf?src-supplier=Digikey, ComponentLink3URL=https://datasheet.ciiva.com/988/dtc143z-988062.pdf?src-supplier=Digikey, ComponentLink4Description=https://datasheet.ciiva.com/988/dtc143z-988063.pdf?src-supplier=Digikey, ComponentLink4URL=https://datasheet.ciiva.com/988/dtc143z-988063.pdf?src-supplier=Digikey, Item Type=Mosfet, Manufacturer Part Number=DTC143ZETL, Pricing="1=0.24, 10=0.145, 50=0.145, 100=0.064, 1000=0.064, 10000=0.04 (USD)", RoHS=Yes, Stock=24993, Supplier=Mouser
Q8: "40V 200mW 100 200mA NPN SOT-23 Bipolar (BJT) ROHS", LCSC Part Number=C5249683, Manufacturer=ElecSuper, Package=SOT-23, ComponentLink1Description=LCSC, ComponentLink1URL=https://www.lcsc.com/product-detail/Bipolar-BJT_ElecSuper-MMBT3904_C5249683.html, Item Type=(BJT), Manufacturer Part Number=MMBT3904
Q9: "30V 5.8A 32mΩ@10V,5.8A 1.4W 1.4V@250uA N Channel SOT-23 MOSFETs ROHS", LCSC Part Number=C344010, Manufacturer=BORN, ComponentLink1Description=LCSC, ComponentLink1URL=https://www.lcsc.com/product-detail/MOSFETs_BORN-AO3400A_C344010.html, Item Type=Mosfet, Manufacturer Part Number=AO3400A
R1 R2 R3 R4 R5 R6 R7: library part RC0402FR-0747KL, "RES 47K OHM 1% 1/16W 0402", Case Code (Imperial)=0402, Case Code (Metric)=1005, LCSC Part Number=C93943, Manufacturer=Yageo, Max Operating Temperature=155°C, Max Power Dissipation=63mW, Min Operating Temperature=-55°C, Package Quantity=1, Power Rating=62.5mW, Resistance=47kR, Resistance Tolerance=1%, Resistor Type="Thick Film", Temperature Coefficient=100ppm/°C, Voltage Rating=50V, Case/Package=0402, Category="Chip SMD Resistors", ComponentLink1Description=https://datasheet.ciiva.com/46412/1018594-46412839.pdf?src-supplier=Element14, ComponentLink1URL=https://datasheet.ciiva.com/46412/1018594-46412839.pdf?src-supplier=Element14, ComponentLink2Description=https://datasheet.ciiva.com/2453/pyu-r-int-thick-7-2453389.pdf?src-supplier=Digi-Key, ComponentLink2URL=https://datasheet.ciiva.com/2453/pyu-r-int-thick-7-2453389.pdf?src-supplier=Digi-Key, ComponentLink3Description=https://datasheet.ciiva.com/2453/pyu-r-int-thick-7-2453390.pdf?src-supplier=Digi-Key, ComponentLink3URL=https://datasheet.ciiva.com/2453/pyu-r-int-thick-7-2453390.pdf?src-supplier=Digi-Key, ComponentLink4Description=https://datasheet.ciiva.com/2453/pyu-r-int-thick-7-2453388.pdf?src-supplier=Digi-Key, ComponentLink4URL=https://datasheet.ciiva.com/2453/pyu-r-int-thick-7-2453388.pdf?src-supplier=Digi-Key, ComponentLink5Description=https://datasheet.ciiva.com/15189/getdatasheetpartid-323748-15189466.pdf?src-supplier=Verical, ComponentLink5URL=https://datasheet.ciiva.com/15189/getdatasheetpartid-323748-15189466.pdf?src-supplier=Verical, ComponentLink6Description=https://datasheet.ciiva.com/16793/pyu-rc0402-51-rohs-l-6-r-16793430.pdf?src-supplier=Future+Electronics, ComponentLink6URL=https://datasheet.ciiva.com/16793/pyu-rc0402-51-rohs-l-6-r-16793430.pdf?src-supplier=Future+Electronics, Construction=Rectangular, Depth=0.5mm, Features="Moisture Resistant", Height=0.016inch, Item Type=Resistor, Lead Free="Lead Free", Length=1mm, Manufacturer Part Number=RC0402FR-0747KL, Military Standard=Not, Number of Terminations=2, Packaging="Tape and Reel", Pricing 1="10000=0.00085, 20000=0.00087, 40000=0.00084, 60000=0.00083, 80000=0.00079, 100000=0.00078, 1000000=0.00076 (USD)", RoHS=Yes, RoHS Compliant=Yes, Series=RC, Size Code=0402, Stock 1=680000, Supplier 1=Avnet, Supplier Part Number 1=RC0402FR-0747KL, Termination=SMD/SMT, Tolerance=1%, Width=0.02inch
R8: library part RC0402FR-073R3L, "RES 3.3 OHM 1% 1/16W 0402", Case Code (Imperial)=0402, Case Code (Metric)=1005, LCSC Part Number=C137986, Manufacturer=Yageo, Max Operating Temperature=155°C, Max Power Dissipation=63mW, Min Operating Temperature=-55°C, Resistance Tolerance=1%, Resistor Type="Thick Film", Supplier Part Number 1=603-RC0402FR-073R3L, Temperature Coefficient=200ppm/°C, Voltage Rating=50V, Case/Package=0402, Category="Chip SMD Resistors", ComponentLink1Description=https://datasheet.ciiva.com/7849/1018594-7849999.pdf?src-supplier=Element14, ComponentLink1URL=https://datasheet.ciiva.com/7849/1018594-7849999.pdf?src-supplier=Element14, ComponentLink2Description=https://datasheet.ciiva.com/8893/pyu-rc0402-51-rohs-l-6-8893711.pdf?src-supplier=Avnet, ComponentLink2URL=https://datasheet.ciiva.com/8893/pyu-rc0402-51-rohs-l-6-8893711.pdf?src-supplier=Avnet, Construction=Rectangular, Contact Plating=Tin,Matte, Depth=0.5mm, Features="Moisture Resistant", Lead Free="Lead Free", Length=1mm, Manufacturer Part Number=RC0402FR-073R3L, Military Standard=Not, Number of Terminations=2, Packaging="Tape and Reel", Power Rating=63mW, Pricing 1="1=0.10000, 10=0.02200, 50=0.02200, 100=0.00900, 1000=0.00400, 10000=0.00200 (USD)", REACH SVHC=Unknown, Resistance=3.3R, RoHS=Yes, RoHS Compliant=Yes, Series=RC, Size Code=0402, Stock 1=167510, Supplier 1=Mouser, Termination=SMD/SMT, Tolerance=1%, Voltage Rating (DC)=50V
R9: library part RC0402FR-075K6L, "RES 5.6K OHM 1% 1/16W 0402", Case Code (Imperial)=0402, Case Code (Metric)=1005, Case/Package=Molded, LCSC Part Number=C163457, Manufacturer=Yageo, Max Operating Temperature=155°C, Min Operating Temperature=-55°C, Power Rating=62.5mW, Resistance Tolerance=1%, Resistor Type="Thick Film", Temperature Coefficient=100ppm/°C, Voltage Rating=50V, ComponentLink1Description=https://datasheet.ciiva.com/12667/pyu-rc0402-51-rohs-l-6-r-12667035.pdf?src-supplier=Mouser, ComponentLink1URL=https://datasheet.ciiva.com/12667/pyu-rc0402-51-rohs-l-6-r-12667035.pdf?src-supplier=Mouser, Construction=Rectangular, Depth=0.5mm, Item Type=Resistors, Lead Free="Lead Free", Length=1mm, Manufacturer Part Number=RC0402FR-075K6L, Military Standard=Not, Packaging="Tape and Reel", Reach SVHC Compliant=Unknown, RoHS=Yes, RoHS Compliant=Yes, Series=RC, Stock=10900, Supplier=Rs, Termination=SMD/SMT, Tolerance=1%, Voltage Rating (AC)=50V
R10: library part RC0402FR-0710KL, "RES 10K OHM 1% 1/16W 0402", Case Code (Imperial)=0402, Case Code (Metric)=1005, LCSC Part Number=C60490, Manufacturer=Yageo, Max Operating Temperature=155°C, Max Power Dissipation=63mW, Min Operating Temperature=-55°C, Power Rating=62.5mW, Resistance=10kR, Resistance Tolerance=1%, Resistor Type="Thick Film", Supplier Part Number 1=603-RC0402FR-0710KL, Temperature Coefficient=100ppm/°C, Voltage Rating=50V, Case/Package=0402, Category="Chip SMD Resistors", ComponentLink1Description=https://datasheet.ciiva.com/7660/38568-7660787.pdf?src-supplier=Element14, ComponentLink1URL=https://datasheet.ciiva.com/7660/38568-7660787.pdf?src-supplier=Element14, ComponentLink2Description=https://datasheet.ciiva.com/7849/1686128-7849814.pdf?src-supplier=Element14, ComponentLink2URL=https://datasheet.ciiva.com/7849/1686128-7849814.pdf?src-supplier=Element14, ComponentLink3Description=https://datasheet.ciiva.com/7983/1018594-7983486.pdf?src-supplier=Element14, ComponentLink3URL=https://datasheet.ciiva.com/7983/1018594-7983486.pdf?src-supplier=Element14, ComponentLink4Description=https://datasheet.ciiva.com/22747/1018594-22747512.pdf?src-supplier=Element14, ComponentLink4URL=https://datasheet.ciiva.com/22747/1018594-22747512.pdf?src-supplier=Element14, ComponentLink5Description=https://datasheet.ciiva.com/12667/pyu-rc0402-51-rohs-l-6-r-12667067.pdf?src-supplier=Mouser, ComponentLink5URL=https://datasheet.ciiva.com/12667/pyu-rc0402-51-rohs-l-6-r-12667067.pdf?src-supplier=Mouser, ComponentLink6Description=https://datasheet.ciiva.com/7849/1784430-7849813.pdf?src-supplier=Element14, ComponentLink6URL=https://datasheet.ciiva.com/7849/1784430-7849813.pdf?src-supplier=Element14, ComponentLink7Description=https://datasheet.ciiva.com/7849/1784430-7849815.pdf?src-supplier=Element14, ComponentLink7URL=https://datasheet.ciiva.com/7849/1784430-7849815.pdf?src-supplier=Element14, Construction=Rectangular, Depth=0.5mm, Features="Moisture Resistant", Height=0.32mm, Item Type=Resistor, Lead Free="Lead Free", Lead Pitch=0.2mm, Length=1mm, Manufacturer Part Number=RC0402FR-0710KL, Military Standard=Not, Number of Pins=2, Number of Terminations=2, Packaging="Tape and Reel", Pricing 1="1=0.10000, 10=0.01400, 50=0.01400, 100=0.00500, 1000=0.00300, 10000=0.00200 (USD)", REACH SVHC="No SVHC", RoHS=Yes, RoHS Compliant=Yes, Series=RC, Stock 1=18648329, Supplier 1=Mouser, Termination=SMD/SMT, Tolerance=1%, Voltage Rating (DC)=50V, Width=0.5mm, Working Voltage=50V
R11: library part RT0402BRD07100KL, "RES SMD 100K OHM 0.1% 1/16W 0402", LCSC Part Number=C852472, Manufacturer=Yageo, Supplier Part Number=YAG1343CT-ND, Voltage Rating (DC)=50V, Category="Chip SMD Resistors", ComponentLink1Description=https://datasheet.ciiva.com/12724/pyu-rt-1-to-0-05-rohs-l-4-12724954.pdf?src-supplier=Mouser, ComponentLink1URL=https://datasheet.ciiva.com/12724/pyu-rt-1-to-0-05-rohs-l-4-12724954.pdf?src-supplier=Mouser, Item Type=Resistor, Manufacturer Part Number=RT0402BRD07100KL, Pricing="1=0.16, 10=0.121, 50=0.0958, 100=0.0859, 500=0.0654, 1000=0.0578, 5000=0.04283 (USD)", RoHS=Yes, Stock=62932, Supplier=Digikey
R12: library part RC0603FR-07120RL, "RES 120 OHM 1% 1/10W 0603", Case Code (Imperial)=0603, Case Code (Metric)=1608, LCSC Part Number=C114640, Manufacturer=Yageo, Max Operating Temperature=155°C, Max Power Dissipation=100mW, Min Operating Temperature=-55°C, Package Quantity=1, Resistance Tolerance=1%, Resistor Type="Thick Film", Supplier Part Number 1=311-120HRCT-ND, Temperature Coefficient=100ppm/°C, Voltage Rating=50V, Case/Package=0603, Category="Chip SMD Resistors", ComponentLink1Description=https://datasheet.ciiva.com/2553/pyu-r-int-thick-7-2553512.pdf?src-supplier=Digi-Key, ComponentLink1URL=https://datasheet.ciiva.com/2553/pyu-r-int-thick-7-2553512.pdf?src-supplier=Digi-Key, ComponentLink2Description=https://datasheet.ciiva.com/7746/443971-7746248.pdf?src-supplier=Element14, ComponentLink2URL=https://datasheet.ciiva.com/7746/443971-7746248.pdf?src-supplier=Element14, ComponentLink3Description=https://datasheet.ciiva.com/2553/pyu-r-int-thick-7-2553513.pdf?src-supplier=Digi-Key, ComponentLink3URL=https://datasheet.ciiva.com/2553/pyu-r-int-thick-7-2553513.pdf?src-supplier=Digi-Key, ComponentLink4Description=https://datasheet.ciiva.com/7746/443971-7746249.pdf?src-supplier=Element14, ComponentLink4URL=https://datasheet.ciiva.com/7746/443971-7746249.pdf?src-supplier=Element14, ComponentLink5Description=https://datasheet.ciiva.com/2553/pyu-r-int-thick-7-2553514.pdf?src-supplier=Digi-Key, ComponentLink5URL=https://datasheet.ciiva.com/2553/pyu-r-int-thick-7-2553514.pdf?src-supplier=Digi-Key, ComponentLink6Description=https://datasheet.ciiva.com/46395/443971-46395021.pdf?src-supplier=Element14, ComponentLink6URL=https://datasheet.ciiva.com/46395/443971-46395021.pdf?src-supplier=Element14, Construction=Rectangular, Depth=0.8mm, Features="Moisture Resistant", Height=0.022inch, Item Type=Resistor, Lead Free="Lead Free", Length=1.6mm, Manufacturer Part Number=RC0603FR-07120RL, Military Standard=Not, Number of Pins=2, Number of Terminations=2, Packaging="Tape and Reel", Power Rating=100mW, Pricing 1="1=0.10000, 10=0.02400, 100=0.00970, 1000=0.00436, 2500=0.00378 (USD)", REACH SVHC="No SVHC", Resistance=120R, RoHS=Yes, RoHS Compliant=Yes, Series=RC, Size Code=0603, Stock 1=839061, Supplier 1=Digi-Key, Termination=SMD/SMT, Tolerance=1%, Voltage Rating (DC)=50V, Width=0.031inch
R13: library part RT0402BRC076K8L, "RES SMD 6.8K OHM 0.1% 1/16W 0402", Case/Package=0402, LCSC Part Number=C852943, Manufacturer=Yageo, Max Operating Temperature=155°C, Max Power Dissipation=63mW, Min Operating Temperature=-55°C, Temperature Coefficient=15ppm/°C, Tolerance=0.1%, Features="Moisture Resistant", Height=0.014inch, Item Type=Resistors, Length=0.039inch, Manufacturer Part Number=RT0402BRC076K8L, Number of Terminations=2, Packaging="Tape and Reel", Pricing="1=0.51, 10=0.36, 50=0.279, 100=0.2487, 500=0.18748, 1000=0.16452, 5000=0.14066 (USD)", RoHS=Yes, RoHS Compliant=Yes, Series=RT, Stock=20494, Supplier=Digikey, Width=0.02inch
R14: library part RT0402BRD078K2L, "RES SMD 8.2K OHM 0.1% 1/16W 0402", Case Code (Imperial)=0402, Case Code (Metric)=1005, LCSC Part Number=C852943, Manufacturer=Yageo, Max Operating Temperature=155°C, Max Power Dissipation=63mW, Min Operating Temperature=-55°C, Package Quantity=10000, Power Rating=62.5mW, Supplier Part Number=YAG4318CT-ND, Temperature Coefficient=25ppm/°C, Tolerance=0.1%, Voltage Rating=50V, Case/Package=0402, Category="Chip SMD Resistors", ComponentLink1Description=https://datasheet.ciiva.com/2582/pyu-rt-1-to-0-05-rohs-l-5-2582520.pdf?src-supplier=Digikey, ComponentLink1URL=https://datasheet.ciiva.com/2582/pyu-rt-1-to-0-05-rohs-l-5-2582520.pdf?src-supplier=Digikey, Height=0.014inch, Item Type=Resistor, Lead Free="Lead Free", Length=0.039inch, Manufacturer Part Number=RT0402BRD078K2L, Number of Terminations=2, Packaging="Tape and Reel", Pricing="1=0.16, 10=0.121, 50=0.0958, 100=0.0859, 500=0.0654, 1000=0.0578, 5000=0.04283 (USD)", RoHS=Yes, RoHS Compliant=Yes, Series=RT, Stock=17016, Supplier=Digikey, Termination=SMD/SMT, Voltage Rating (DC)=50V, Width=0.02inch